# Altium PCB BOARD_ADS.PcbDoc
Units mm, origin at the board's own origin, x right, y up, seen from the top; angles counter-clockwise.
Board outline 100 x 70 mm, 2 copper layers (Top Layer, Bottom Layer); 48 components, 22 nets, 158 pads, 2 vias.
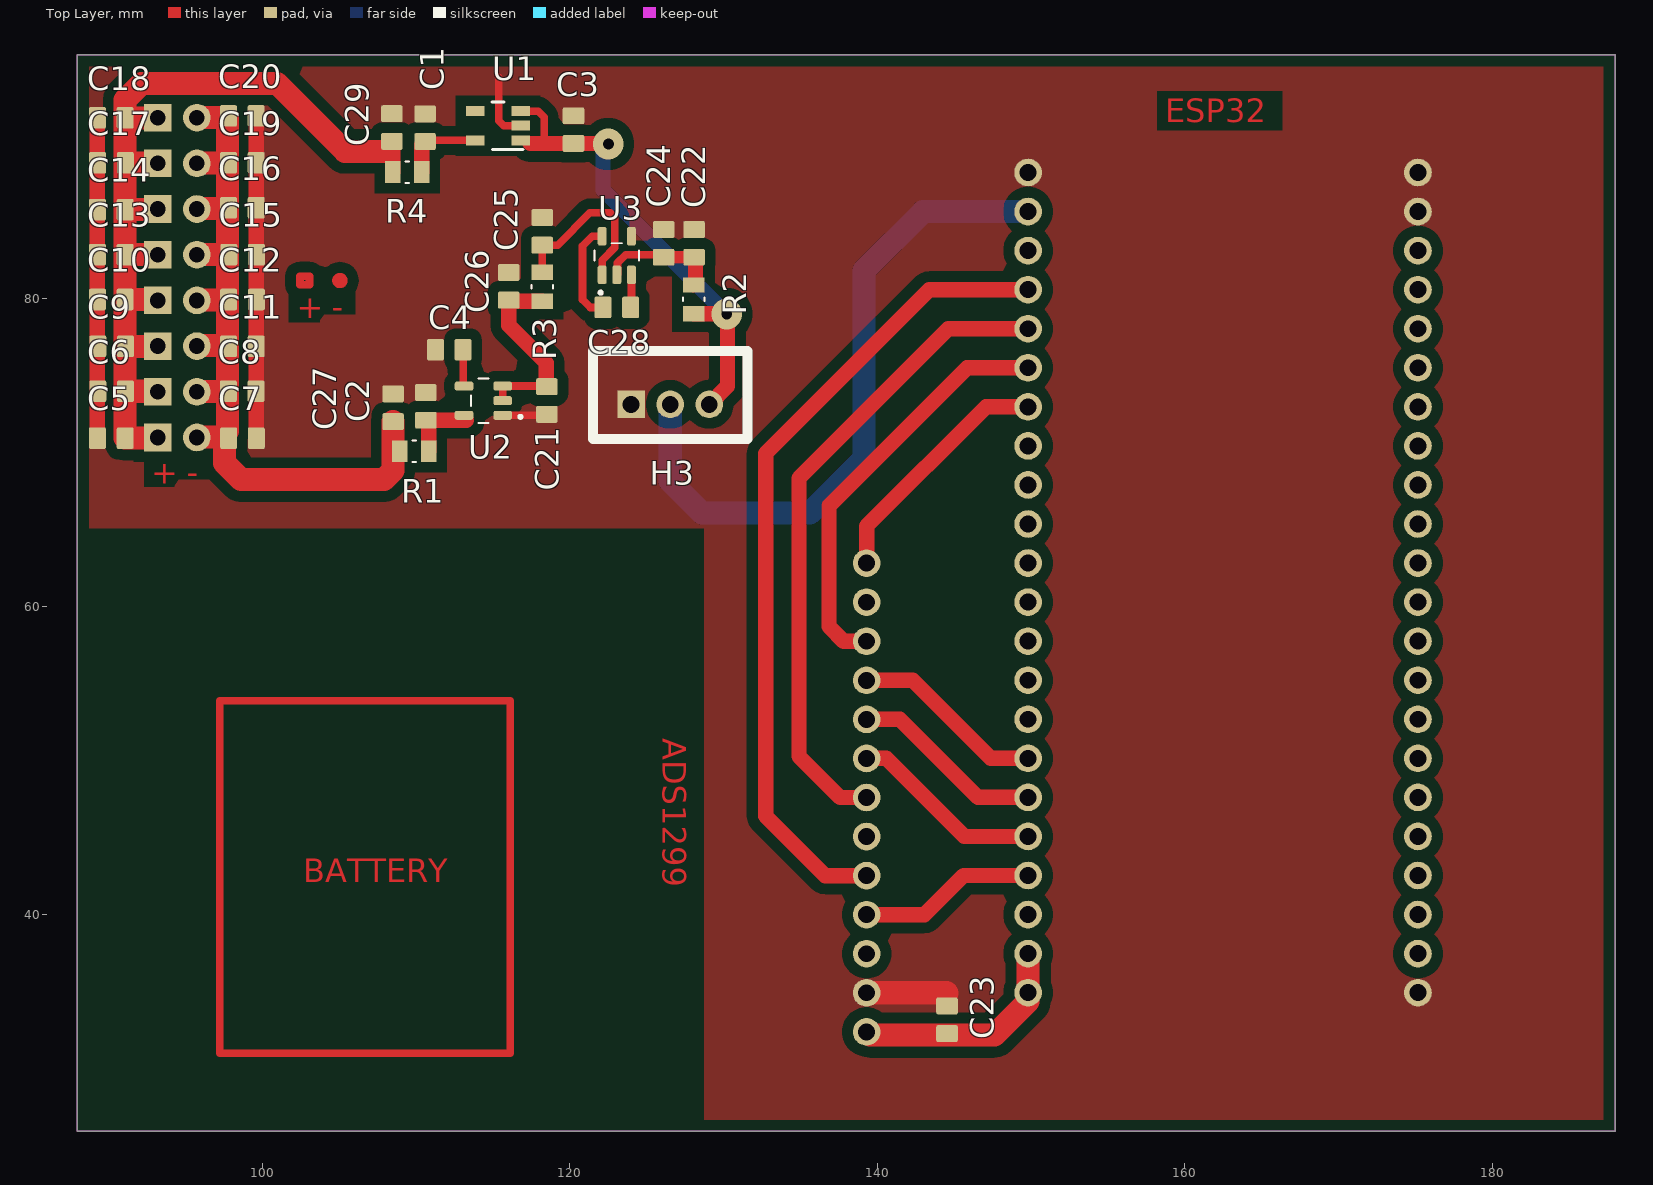
[diagram p0: Top Layer view]
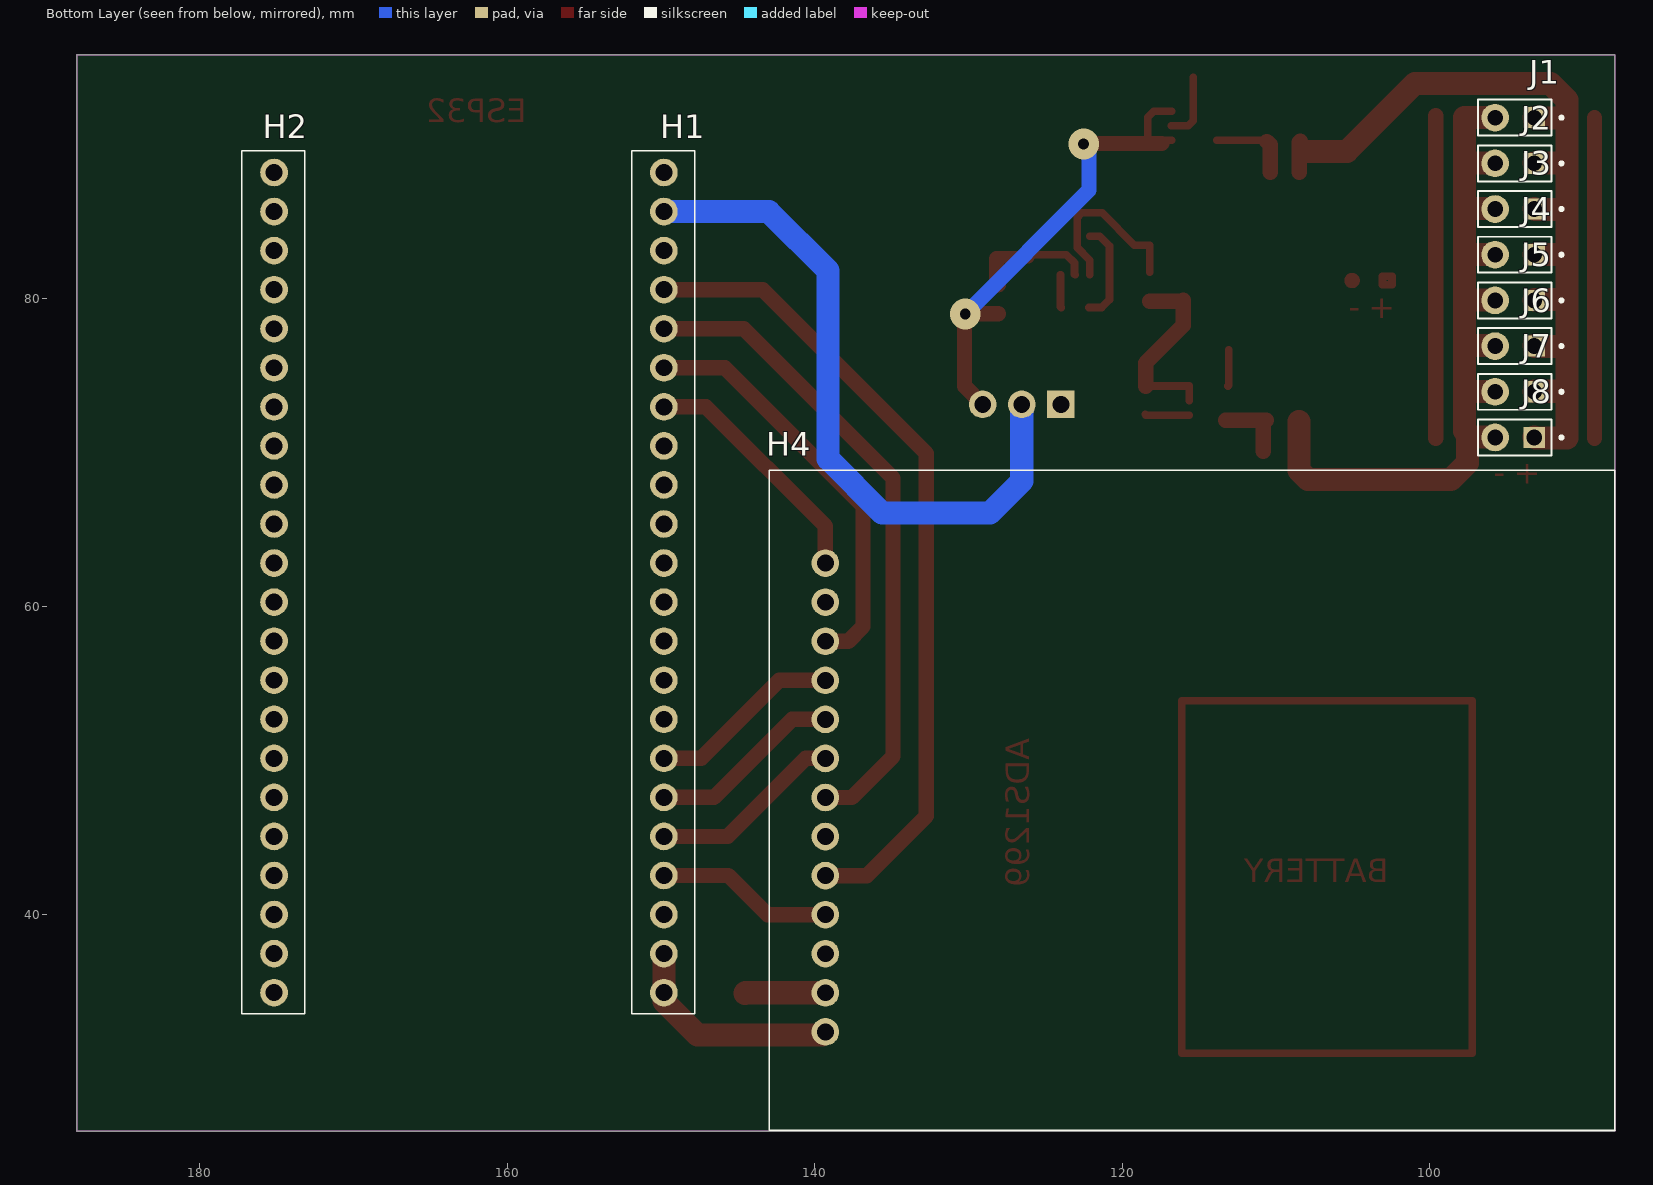
[diagram p1: Bottom Layer view, seen from below]
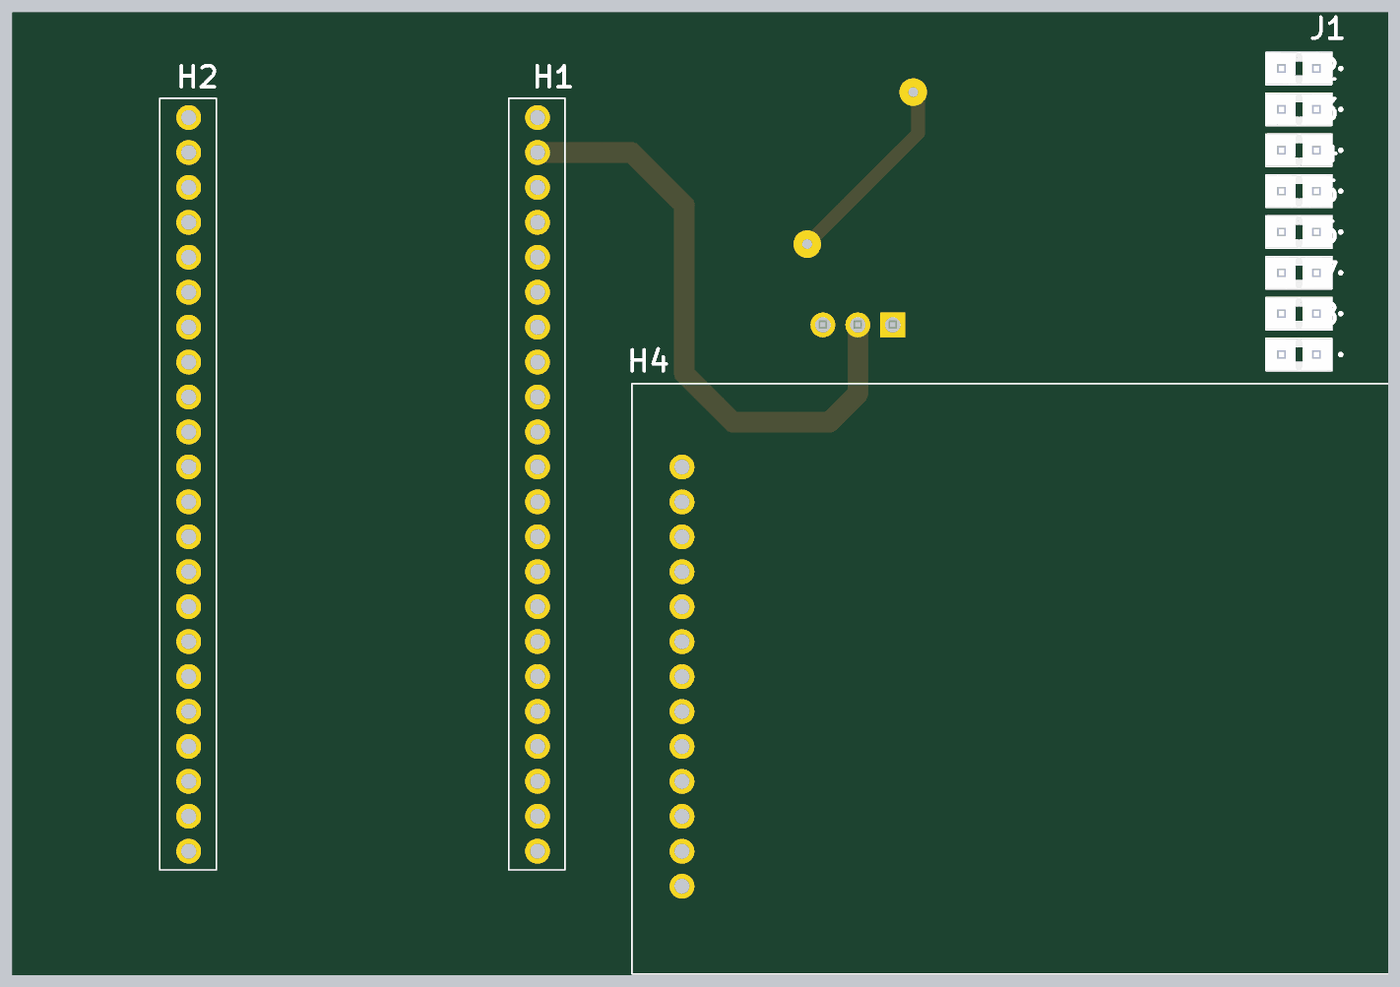
[diagram p2: 3D render of the assembled board from below, using the file's embedded part models]

## Layer stack, top to bottom
Top Solder: solder mask 0.0102, Solder Resist, Dk 3.5
Top Layer: signal copper 0.0356
Dielectric 1: dielectric 0.32, FR-4, Dk 4.8
Bottom Layer: signal copper 0.0356
Bottom Solder: solder mask 0.0102, Solder Resist, Dk 3.5

## Board outline
87.975,25.875 87.975,95.875 187.975,95.875 187.975,25.875

## Design rules (kind name [scope] priority, off if disabled: settings)
Clearance [All] p1: gap=0.254 ignorepadtopadclearanceinfootprint=FALSE except(0.6: Arc-Fill Arc-Region Track-Fill Track-Region SMDPad-Fill SMDPad-Region THPad-Fill THPad-Region Via-Fill Via-Region Fill-Fill Fill-Region Poly-Region Region-Region; 0.7: Arc-Poly Track-Poly SMDPad-Poly THPad-Poly Via-Poly Fill-Poly Poly-Poly)
PolygonConnect [All] p1: connectstyle=Direct reliefconductorwidth=0.254 reliefentries=4 polygonreliefangle="90 Angle" airgapwidth=0.254
RoutingVias [All] p1: holewidth=0.711 width=1.27 viastyle="Through Hole" minholewidth=0.711 minwidth=1.27 maxholewidth=0.711 maxwidth=1.27
SolderMaskExpansion [All] p1: expansion=0 istentingtop=FALSE
SupplyNets "Schematic Supply Nets_6" [InNet('VBAT_NEG')] p1: voltage=0.000
SupplyNets "Schematic Supply Nets" [InNet('VBAT')] p2: voltage=0.000
SupplyNets "Schematic Supply Nets_5" [InNet('GND')] p3: voltage=0.000
SupplyNets "Schematic Supply Nets_4" [InNet('2V5')] p4: voltage=0.000
SupplyNets "Schematic Supply Nets_3" [InNet('3V3')] p5: voltage=0.000
SupplyNets "Schematic Supply Nets_2" [InNet('-2V5')] p6: voltage=0.000
SupplyNets "Schematic Supply Nets_1" [InNet('5V')] p7: voltage=0.000
Width [All] p1: maxlimit=3 minlimit=0.254 preferedwidth=0.254
30 further rules are at their usual default settings.

## Components (designator, comment, footprint, x,y, rotation, side; value= is the part's Value field where it differs from the comment)
C1 "1uF" C0805L 110.582,91.141 r90 top
C2 "4.7uF" C0805L 110.63,73.016 r90 top
C3 "1uF" C0805L 120.234,91.014 r90 top
C4 "10nF" C0805L 112.154,76.699 r180 top
C5 "100nF" C0805L 90.176,70.95 r0 top
C6 "100nF" C0805L 90.198,73.998 r0 top
C7 "100nF" C0805L 98.707,70.95 r180 top
C8 "100nF" C0805L 98.685,73.998 r180 top
C9 "100nF" C0805L 90.198,76.919 r0 top
C10 "100nF" C0805L 90.176,79.967 r0 top
C11 "100nF" C0805L 98.696,76.919 r180 top
C12 "100nF" C0805L 98.707,79.967 r180 top
C13 "100nF" C0805L 90.176,82.888 r0 top
C14 "100nF" C0805L 90.176,85.809 r0 top
C15 "100nF" C0805L 98.717,82.882 r180 top
C16 "100nF" C0805L 98.696,85.936 r180 top
C17 "100nF" C0805L 90.187,88.857 r0 top
C18 "100nF" C0805L 90.176,91.778 r0 top
C19 "100nF" C0805L 98.696,88.857 r180 top
C20 "100nF" C0805L 98.696,91.905 r180 top
C21 "4.7uF" C0805L 118.504,73.397 r270 top
C22 "10uF" C0805L 128.075,83.615 r90 top
C23 "100nF" C0805L 144.525,33.125 r90 top
C24 "1uF" C0805L 126.1,83.615 r90 top
C25 "1uF" C0805L 118.2,84.4 r90 top
C26 "10uF" C0805L 116.025,80.825 r90 top
C27 "10uF" C0805L 108.5,72.925 r90 top
C28 "1uF" C0805L 123.05,79.45 r0 top
C29 "10uF" C0805L 108.425,91.15 r90 top
H1 "HEADER_22P" header_22p 149.799,88.227 r0 bottom
H2 "HEADER_22P" header_22p 175.15,88.227 r0 bottom
H3 "POWER" XH2.54M-3 123.985,73.15 r0 top
H4 "MODULE ADS" "MODULE ADS1299" 139.3,47.58 r270 bottom
J1 "" HEADER_2P 93.197,91.792 r0 bottom
J2 "" HEADER_2P 93.197,88.821 r0 bottom
J3 "" HEADER_2P 93.197,85.85 r0 bottom
J4 "" HEADER_2P 93.197,82.879 r0 bottom
J5 "" HEADER_2P 93.197,79.908 r0 bottom
J6 "" HEADER_2P 93.197,76.937 r0 bottom
J7 "" HEADER_2P 93.197,73.966 r0 bottom
J8 "" HEADER_2P 93.197,70.995 r0 bottom
R1 "0R" R0805 109.875,70.1 r180 top
R2 "0R" R0805 128.05,79.975 r90 top
R3 "0R" R0805 118.2,80.8 r270 top
R4 "0R" R0805 109.425,88.25 r180 top
U1 "LP5907MFX-2.5/NOPB" DBV0005A_M 115.314,91.267 r180 top
U2 "TPS72325DBVR" SOT95P280X145-5N 114.37,73.386 r180 top
U3 "TPS60403DBVR" SOT95P280X145-5N 123.05,82.825 r90 top

## Footprints (in the part's own frame and the unit in brackets; to place one, negate y for a bottom-side part, rotate by r counter-clockwise, add the part's x,y. Pads: shape width x height; smd on the part's side, far side on the other; paste and mask are expansions set on the pad)
C0805L [mm]
  rrect20% 1.1x1.4 smd mask+0.05: 1(-0.9,0) 2(0.9,0)
  body extent -1.1,-0.72 1.1,0.72, height 1.1
DBV0005A_M [mm]
  rect 1.2x0.65 smd paste+0 mask+0.051: 1(-1.475,0.95) 2(-1.475,0) 3(-1.475,-0.95) 4(1.475,-0.95) 5(1.475,0.95)
  silkscreen extent -1.63,-1.55 0.38,1.55, body extent -1.4,-1.45 1.4,1.45, height 1.2
HEADER_2P [mm]
  rect 1.37x1.37 / inner round 1.37 / far side rect 1.8x1.8 hole 1.02: 1(0,0)
  round 1.8 hole 1.02: 2(2.54,0)
  silkscreen extent -1.87,-1.17 3.66,1.17, body extent -1.12,-1.17 3.66,1.17, height 10.03
header_22p [mm]
  round 1.8 hole 1.1 paste-2539.97: 1(0,53.34) 2(0,50.8) 3(0,48.26) 4(0,45.72) 5(0,43.18) 6(0,40.64) 7(0,38.1) 8(0,35.56) 9(0,33.02) 10(0,30.48) 11(0,27.94) 12(0,25.4) 13(0,22.86) 14(0,20.32) 15(0,17.78) 16(0,15.24) 17(0,12.7) 18(0,10.16) 19(0,7.62) 20(0,5.08) 21(0,2.54) 22(0,0)
  silkscreen extent -2,-1.4 2.1,54.7
"MODULE ADS1299" [mm]
  round 1.8 hole 1.1 paste-2539.97: 1(15.24,0) 2(12.7,0) 3(10.16,0) 4(7.62,0) 5(5.08,0) 6(2.54,0) 7(0,0) 8(-2.54,0) 9(-5.08,0) 10(-7.62,0) 11(-10.16,0) 12(-12.7,0) 13(-15.24,0)
  round 1.65 hole 1.1 paste-2539.97: 1(15.24,0)
  silkscreen extent -21.29,-3.64 21.63,51.36, body extent -21.41,-3.56 21.54,51.37, height 9.7
R0805 [mm]
  rect 1x1.42 smd: 1(-0.935,0) 2(0.935,0)
  silkscreen extent -0.12,-0.7 0.12,0.7, body extent -1,-0.63 1,0.63, height 0.6
SOT95P280X145-5N [mm]
  rrect50% 1.21x0.59 smd: 1(-1.255,0.95) 2(-1.255,0) 3(-1.255,-0.95) 4(1.255,-0.95) 5(1.255,0.95)
  silkscreen extent -2.51,-1.45 0.8,1.45, body extent -1.4,-1.45 1.4,1.45, height 1.45
XH2.54M-3 [mm]
  rect 1.8x1.8 hole 1.1: 1(0,0)
  round 1.8 hole 1.1: 2(2.54,0) 3(5.08,0)
  silkscreen extent -2.48,-2.26 7.56,3.46, body extent -2.48,-2.26 7.56,3.48, height 6.91

## Part data
C1 C2 C3 C4 C5 C6 C7 C8 C9 C10 C11 C12 C13 C14 C15 C16 C17 C18 C19 C20 C21 C22 C23 C24 C25 C26 C27 C28 C29: library part C0805, "CAP 0402 MLCC NON-POLARIZED GENERIC; VALUE TOLERANCE VOLTAGE AND MPN SET ON INSTANCE", Case=0402, Value2=SET_VOLTAGE, Package=0402, Type=Capacitor
H3: library part "Header 3P 2.54 Duc Thang", "Cắm", Chung_Loai=Cắm, Don_Vi=Con, Ma_Hang=MH001292, Ten_Linh_Kien="Header 3P XH2.54-3P Đực Thẳng"
H4: library part MODULE_ADS, "Cắm", Chung_Loai=Cắm, Don_Vi=Con, Ma_Hang=MH007094, Ten_Linh_Kien="Header 10P XH2.54-10P Đực Cong"
J1 J2 J3 J4 J5 J6 J7 J8: library part "HEADER 2P", "HEADER ASSEMBLY, NARROW, MTA-100, 2 POSITION, STRAIGHT", Package=None, Check_prices=https://www.snapeda.com/parts/3-644456-2/TE+Connectivity+AMP+Connectors/view-part/?ref=eda, MF="TE Connectivity", MP=3-644456-2, SnapEDA_Link=https://www.snapeda.com/parts/3-644456-2/TE+Connectivity+AMP+Connectors/view-part/?ref=snap
R1 R2 R3 R4: library part R0805, "RES 0805 GENERIC; VALUE TOLERANCE POWER AND MPN SET ON INSTANCE", Case=0805, Value1=SET_VALUE, Package=0805, Type=Resistor
U1: library part LP5907MFX-2.5NOPB, "250-mA, low-noise, high-PSRR, ultra-low-dropout voltage regulator with low IQ and enable 5-SOT-23 -40 to 125", Manufacturer_Name="Texas Instruments", Copyright="Copyright (C) 2026 Ultra Librarian. All rights reserved.", Manufacturer_Part_Number=LP5907MFX-2.5/NOPB, RefDes=RefDes, Type=TYPE
U2: "200-mA, negative, adjustable low-dropout voltage regulator with enable", Package="SOT-23-5 Texas Instruments", Check_prices=https://www.snapeda.com/parts/TPS72325DBVR/Texas+Instruments/view-part/?ref=eda, MF="Texas Instruments", MP=TPS72325DBVR, SnapEDA_Link=https://www.snapeda.com/parts/TPS72325DBVR/Texas+Instruments/view-part/?ref=snap
U3: "60mA Charge Pump Voltage Inverter with Fixed 250kHz Operation", Package="SOT-23-5 Texas Instruments", Check_prices=https://www.snapeda.com/parts/TPS60403DBVR/Texas+Instruments/view-part/?ref=eda, MF="Texas Instruments", MP=TPS60403DBVR, SnapEDA_Link=https://www.snapeda.com/parts/TPS60403DBVR/Texas+Instruments/view-part/?ref=snap

## Via types
v1: diameter 2, hole 0.711, Top Layer to Bottom Layer, 2 vias

## Nets (pads, with @x,y where several pads share a name; then routed paths per layer and width w, separated by ;. In a path a pad name is that pad's centre, name@x,y a point inside that pad or via, vN(x,y) a via of type N, cw(c..) or ccw(c..) an arc to the next point about the centre after c; other vN are vias at no path point)
2V5: C5.2 C6.2 C9.2 C10.2 C13.2 C14.2 C17.2 C18.2 C29.1 J1.1 J2.1 J3.1 J4.1 J5.1 J6.1 J7.1 J8.1 R4.2 | length 60.2
  Top Layer w1: C29.1 108.49,90.185 R4.2
  Top Layer w1.5: C17.2 93.185,88.857 J2.1@93.196,88.845 ; C6.2 93.189,73.998 J7.1@93.196,73.99 ; C9.2 93.154,76.919 J6.1@93.196,76.961 ; J8.1@93.196,71.019 93.127,70.95 C5.2 C10.2 ; J5.1@93.196,79.932 93.162,79.967 C10.2 ; J4.1@93.196,82.903 93.181,82.888 C13.2 ; J3.1@93.196,85.874 93.131,85.809 C14.2 ; J1.1@93.196,91.816 93.158,91.778 C18.2 ; 107.925,89.6 105.375,89.6 100.95,94.025 92.15,94.025 91.076,92.951 C18.2 ; C10.2 C13.2 ; C13.2 C14.2 ; C14.2 C18.2
3V3: C23.1 H1.1 H1.2 H4.1 | length 14.6
  Top Layer w1.5: H4.1@139.3,32.34 139.515,32.125 147.6,32.125 149.799,34.324 H1.1 H1.2
5V: H1.21 H3.2 | length 44.4
  Bottom Layer w1.5: H3.2 126.525,68.15 128.6,66.075 135.6,66.075 139.125,69.6 139.125,81.837 142.975,85.687 H1.21
-2V5: C7.2 C8.2 C11.2 C12.2 C15.2 C16.2 C19.2 C20.2 C27.1 J1.2 J2.2 J3.2 J4.2 J5.2 J6.2 J7.2 J8.2 R1.2 | length 53
  Top Layer w1.5: J8.2@95.736,71.019 97.319,71.019 97.725,71.425 C8.2@97.725,74.05 ; J7.2@95.736,73.99 97.665,73.99 C8.2@97.725,74.05 ; J6.2@95.736,76.961 97.714,76.961 C11.2@97.725,76.95 ; J5.2@95.736,79.932 97.693,79.932 C12.2@97.725,79.9 ; J4.2@95.736,82.903 97.697,82.903 C15.2@97.725,82.875 ; J3.2@95.736,85.874 C16.2@97.725,85.874 ; J2.2@95.736,88.845 97.713,88.845 C19.2@97.725,88.857 ; J1.2@95.736,91.816 97.658,91.816 C20.2@97.725,91.75 ; C7.2@97.55,70.95 97.55,69.325 98.625,68.25 107.9,68.25 108.5,68.85 108.5,70.1 C27.1 ; C20.2@97.725,91.816 C20.2@97.725,91.75 ; C16.2@97.734,85.874 C16.2@97.725,85.874 ; C8.2@97.725,74.05 C11.2@97.725,76.95 ; C11.2@97.725,76.95 C12.2@97.725,79.9 ; C12.2@97.725,79.9 C15.2@97.725,82.875 ; C15.2@97.725,82.875 C16.2@97.725,85.874 ; C16.2@97.725,85.874 C19.2@97.725,88.857 ; C19.2@97.725,88.857 C20.2@97.725,91.75
CS: H1.16 H4.13 | length 16.1
  Top Layer w1: H4.13 139.3,65.225 147.062,72.987 H1.16
DRDY: H1.4 H4.4 | length 11.6
  Top Layer w1: H4.4 143.06,39.96 145.607,42.507 H1.4
GND: C1.2 C2.2 C3.2 C4.2 C5.1 C6.1 C7.1 C8.1 C9.1 C10.1 C11.1 C12.1 C13.1 C14.1 C15.1 C16.1 C17.1 C18.1 C19.1 C20.1 C21.2 C22.2 C23.2 C24.2 C25.2 C26.2 C27.2 C29.2 H1.22 H2.1 H2.21 H2.22 H3.1 H4.2 U1.2 U2.1 U3.4 | length 54.3
  Top Layer w0.5: 115.375,94.425 115.375,91.6 115.708,91.267 U1.2 ; U2.1 118.443,72.436 C21.2
  Top Layer w1: C5.1 C10.1 C13.1 C14.1 C18.1 ; C20.1 C19.1 C16.1 C11.1 99.596,70.961 C7.1
  Top Layer w1.5: H4.2 144.495,34.88 144.525,34.85
MISO: H1.19 H4.5 | length 53.2
  Top Layer w1: H4.5 136.6,42.5 132.725,46.375 132.725,69.95 143.382,80.607 H1.19
MOSI: H1.17 H4.11 | length 27.4
  Top Layer w1: H4.11 137.81,57.74 136.85,58.7 136.85,66.55 145.827,75.527 H1.17
NetC1_1: C1.1 R4.1 U1.5 | length 5.4
  Top Layer w0.5: C1.1 110.658,90.317 U1.5
  Top Layer w1: R4.1 110.36,90.019 C1.1
NetC2_1: C2.1 R1.1 U2.5 | length 4.7
  Top Layer w1: R1.1 110.81,71.936 C2.1 113.275,72.116
NetC4_1: C4.1 U2.4 | length 2.4
  Top Layer w0.5: C4.1 113.054,74.397 U2.4
NetC22_1: C22.1 C24.1 R2.2 U3.2 | length 7.8
  Top Layer w0.5: U3.2 123.095,81.615 123.095,82.345 123.625,82.875 125.94,82.875 C24.1
  Top Layer w0.8: C24.1 C22.1
  Top Layer w1: R2.2 128.165,81.025 C22.1@128.165,82.625
NetC25_1: C25.1 R3.1 U3.1 | length 11.6
  Top Layer w0.5: R3.1 C25.1 119.2,83.5 121.3,85.6 122.625,85.6 122.925,85.3 122.925,83.349 122.1,82.524 U3.1
NetC28_1: C28.1 U3.5 | length 6.6
  Top Layer w0.5: U3.5 121.455,84.08 120.825,83.45 120.825,79.95 121.325,79.45 C28.1
NetC28_2: C28.2 U3.3 | length 2.1
  Top Layer w0.5: C28.2 124,79.5 U3.3
PWDN: H1.7 H4.10 | length 12.6
  Top Layer w1: H4.10 142.3,55.2 147.373,50.127 H1.7
RESET: H1.6 H4.9 | length 12.7
  Top Layer w1: H4.9 141.465,52.66 146.538,47.587 H1.6
  Bottom Layer w1: H1.6@149.672,47.587 H1.6
SCLK: H1.18 H4.7 | length 42.5
  Top Layer w1: H4.7 137.57,47.58 134.9,50.25 134.9,68.35 144.617,78.067 H1.18
START: H1.5 H4.8 | length 12.6
  Top Layer w1: H4.8 140.58,50.12 145.653,45.047 H1.5
VBAT: C3.1 H3.3 R2.1 U1.1 U1.3 | length 31.7
  Top Layer w0.5: U1.1 U1.1@117.275,90.317 ; U1.3 117.933,92.217 118.325,91.825 118.325,90.525
  Top Layer w1: 117.414,90.114 118.325,90.114 122.461,90.114 v1(122.5,90.075) ; R2.1 128.06,79.05 130.175,79.05 130.25,78.975 130.25,74.335 H3.3
  Bottom Layer w1: v1(122.5,90.075) 122.15,89.725 122.15,87.075 v1(130.2,79.025)
VBAT_NEG: C21.1 C26.1 R3.2 U2.2 U2.3 | length 12.6
  Top Layer w0.5: U2.2 U2.3 C21.1@118.465,74.336
  Top Layer w1: R3.2 116.085,79.865 C26.1 116.025,78.275 118.465,75.835 C21.1@118.465,74.336
pads on no net: H1.3 H1.8 H1.9 H1.10 H1.11 H1.12 H1.13 H1.14 H1.15 H1.20 H2.2 H2.3 H2.4 H2.5 H2.6 H2.7 H2.8 H2.9 H2.10 H2.11 H2.12 H2.13 H2.14 H2.15 H2.16 H2.17 H2.18 H2.19 H2.20 H4.3 H4.6 H4.12 U1.4
copper on no net: | length 87.6
  Top Layer w0.5: 97.225,30.95 116.125,30.95 116.125,53.875 97.225,53.875 97.225,30.95 ; 102.442,80.924 103.067,80.924 103.067,81.474 102.442,81.474 102.442,80.924 ; 105.292,81.199 ccw(c105.042,81.199) 105.292,81.199

## Polygon pours and split planes (outlines as drawn)
GND on Top Layer "GND_L01_P000" (solid, remove dead copper, pour order 0): 187.975,95.875 187.975,25.882 128.725,25.882 128.725,65.075 87.991,65.075 87.991,25.866 87.975,25.882 87.975,95.875

## Keep-outs
Keep-Out Layer:
  the board outline again, w0.1

## Other copper
Top Layer:
  text "ESP32" at 158.704,91.479 h1.52
  text "+" at 102.221,78.749 h1.52
  text "-" at 104.521,78.741 h1.52
  text "+" at 92.779,68 h1.52
  text "-" at 95.079,67.992 h1.52
  text "ADS1299" at 126.054,51.421 h1.52 r270
  text "BATTERY" at 102.654,42.079 h1.52